# Altium PCB ECE453.PcbDoc
Units mm, origin at the board's own origin, x right, y up, seen from the top; angles counter-clockwise.
Board outline 100 x 100 mm, 2 copper layers (Top Layer, Bottom Layer); 36 components, 16 nets, 110 pads, 40 vias.
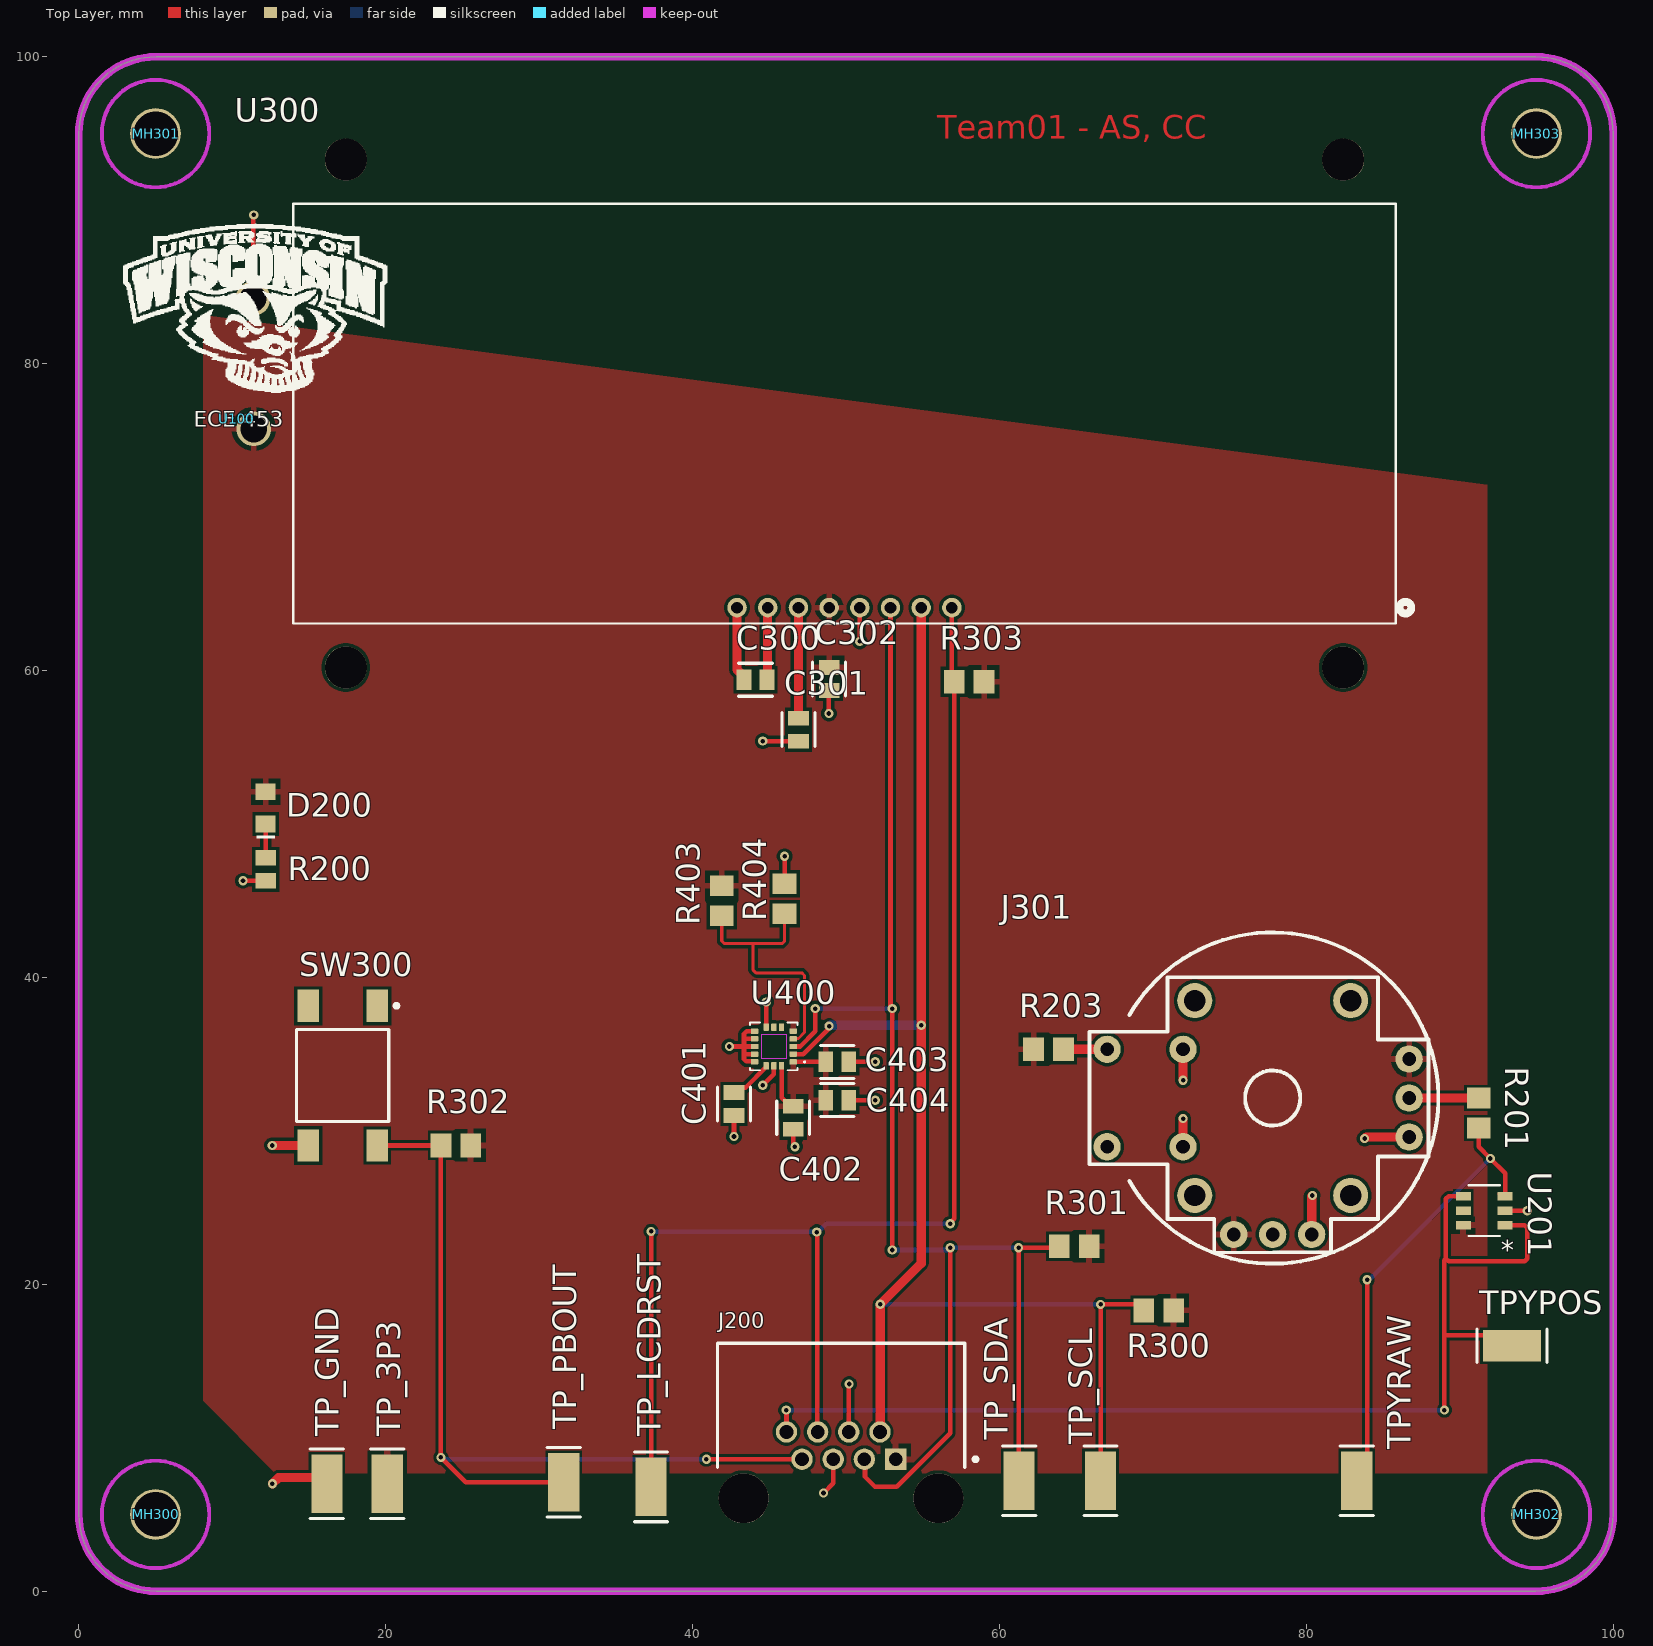
[diagram p0: Top Layer view]
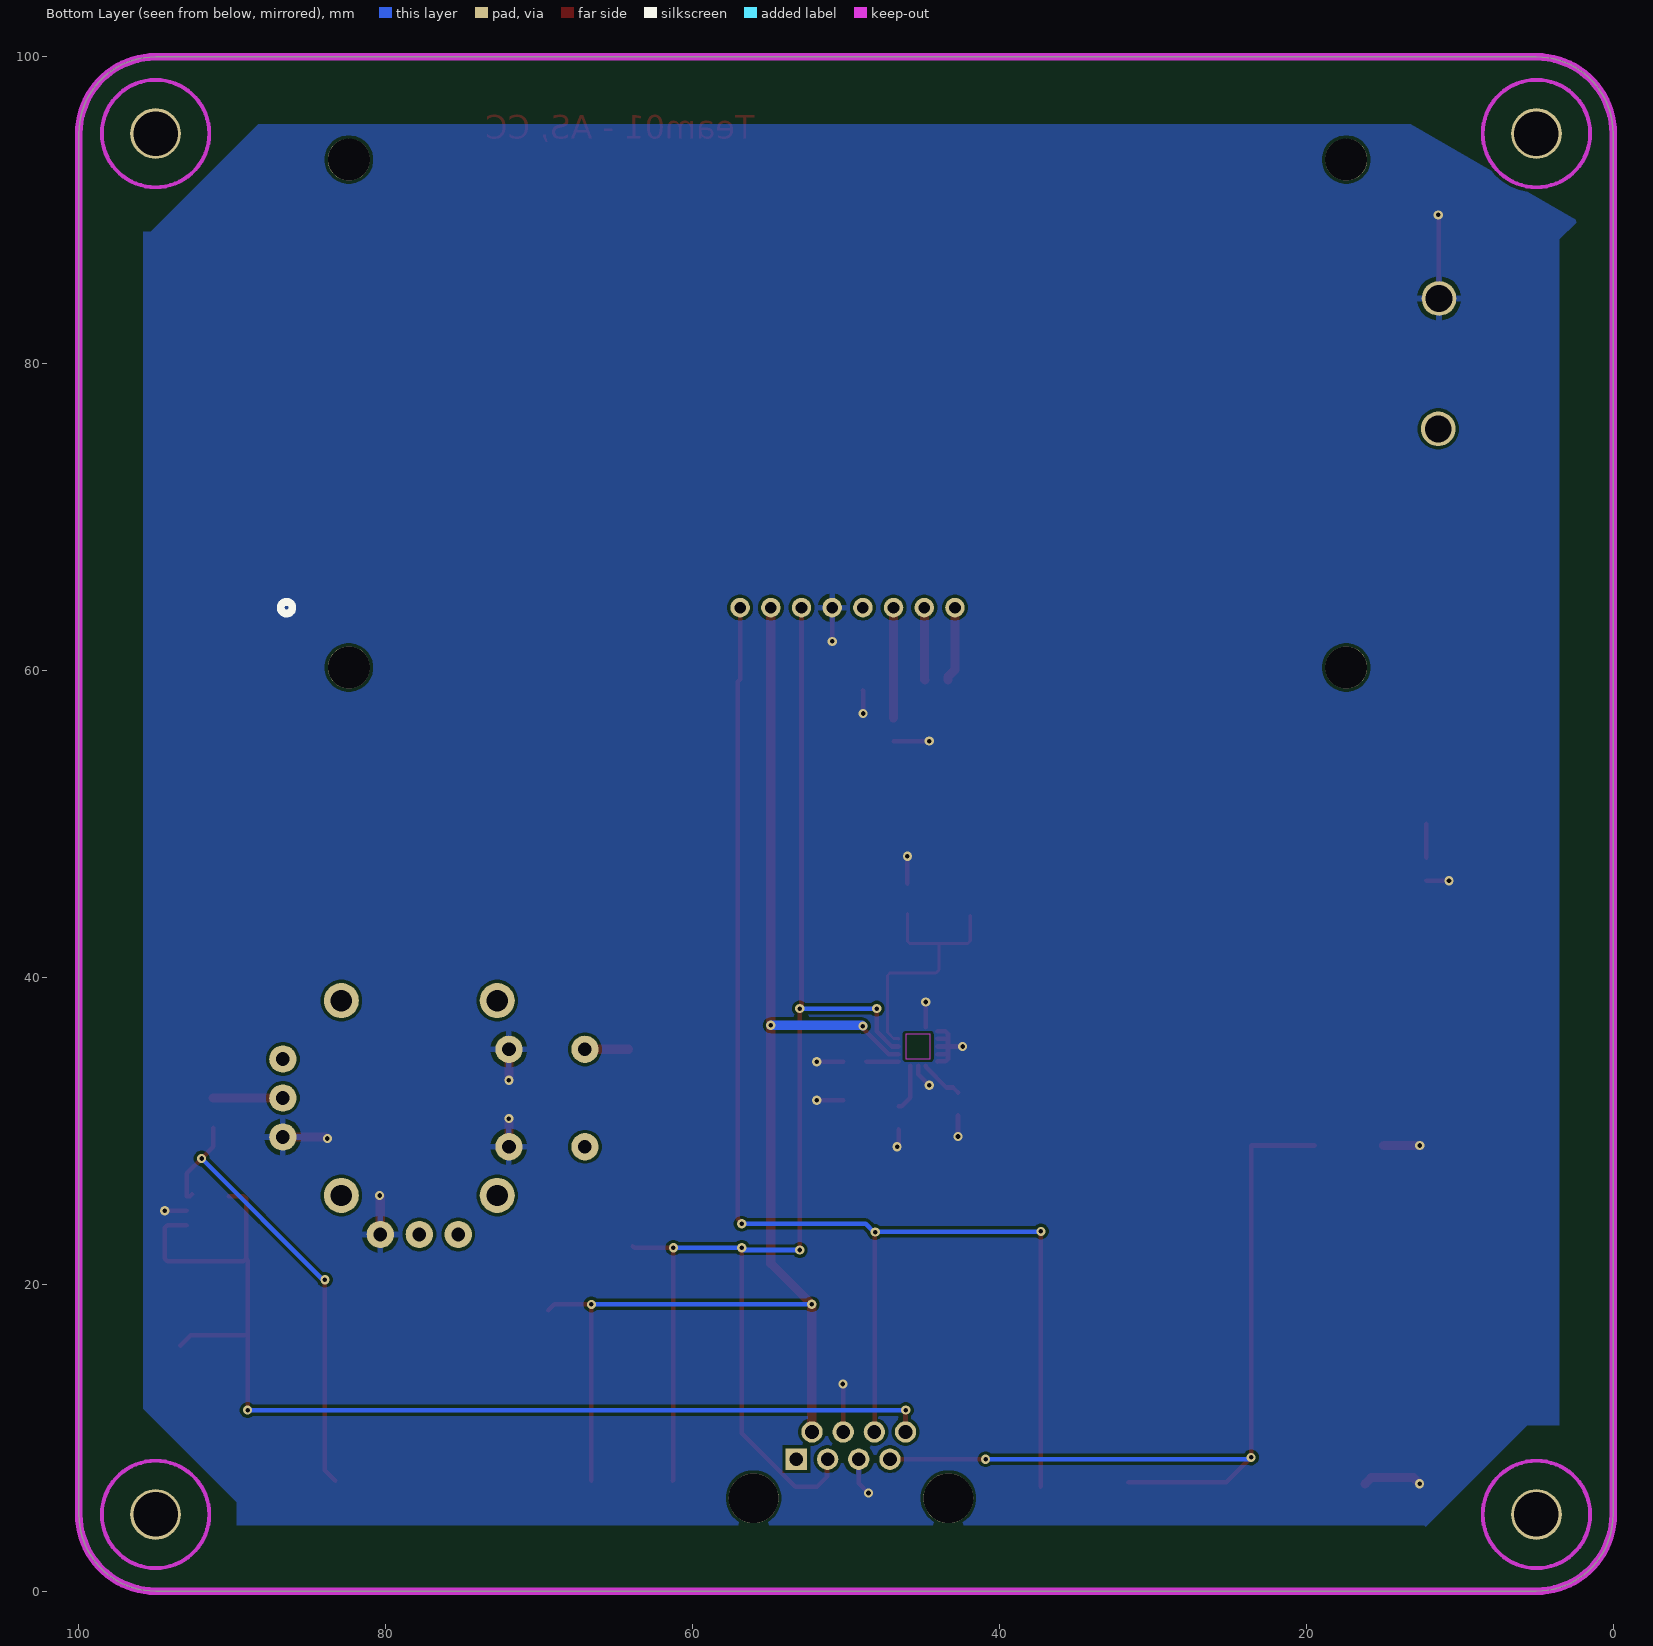
[diagram p1: Bottom Layer view, seen from below]

## Layer stack, top to bottom
Top Solder: solder mask 0.0102, Solder Resist, Dk 3.5
Top Layer: signal copper 0.0356
Dielectric1: dielectric 0.32, FR-4, Dk 4.8
Bottom Layer: signal copper 0.0356
Bottom Solder: solder mask 0.0102, Solder Resist, Dk 3.5

## Board outline
0,5 ccw(c5,5) 5,0 95,0 ccw(c95,5) 100,5 100,95 ccw(c95,95) 95,100 5,100 ccw(c5,95) 0,95

## Design rules (kind name [scope] priority, off if disabled: settings)
Clearance Polygon_Clearance [All vs InPolygon] p1: gap=0.2 ignorepadtopadclearanceinfootprint=FALSE
Clearance [All] p2: gap=0.2 ignorepadtopadclearanceinfootprint=TRUE
ComponentClearance [InComponent('U3')] p1: gap=0 collisioncheckmode=3 verticalgap=0.254 showdistances=FALSE
Height [All] p1: minheight=0 maxheight=75 prefheight=12.7
HoleSize [All] p1: absolutevalues=TRUE maxlimit=6.35 minlimit=0.3 maxpercent=80.000 minpercent=20.000
MinimumAnnularRing [All] p1: minimumring=0.15
MinimumSolderMaskSliver [All] p1: minsoldermaskwidth=0.2
NetAntennae NetAntennae_5.0V [InNet('5.0V')] p1: netantennaetolerance=0
NetAntennae NetAntennae_3.3V [InNet('3.3V')] p2: netantennaetolerance=0
PlaneClearance [All] p1: clearance=0.3
PlaneConnect [All] p1: planeconnectstyle=Relief reliefexpansion=0.3 reliefentries=4 reliefconductorwidth=0.3 reliefairgap=0.3
PolygonConnect ViaConnect [All vs IsVia] p1: connectstyle=Direct reliefconductorwidth=0.381 reliefentries=4 polygonreliefangle="90 Angle" airgapwidth=0.254
PolygonConnect [All] p2: connectstyle=Relief reliefconductorwidth=0.4 reliefentries=4 polygonreliefangle="90 Angle" airgapwidth=0.3
RoutingVias [All] p1: holewidth=0.3 width=0.6 viastyle="Through Hole" minholewidth=0.3 minwidth=0.6 maxholewidth=5 maxwidth=10
SilkToSilkClearance [All] p1: silktosilkclearance=0
SilkToSolderMaskClearance [IsPad] p1: minsilkscreentomaskgap=0 clearancetoexposedcopper=TRUE
SolderMaskExpansion [All] p1: expansion=0.102 istentingtop=FALSE
SupplyNets "Schematic Supply Nets_1" [InNet('GND')] p1: voltage=0.000
SupplyNets "Schematic Supply Nets" [InNet('3.3V')] p2: voltage=0.000
UnConnectedPin [All] p1 off:
Width [All] p1: maxlimit=10 minlimit=0.2 preferedwidth=0.6
21 further rules are at their usual default settings.

## Classes and differential pairs
component class 04-ICs: C401 C402 C403 C404 J301 R201 R203 R403 R404 TPYPOS TPYRAW U201 U400
component class 02_Connectors: D200 J200 R200

## Components (designator, comment, footprint, x,y, rotation, side; value= is the part's Value field where it differs from the comment)
C300 "C0805C104M5RAC7210" FP-C0805C-DN-MFG 44.1,59.4 r0 top value="0.10 μF"
C301 "C0805C104M5RAC7210" FP-C0805C-DN-MFG 46.9,56.15 r270 top value="0.10 μF"
C302 "C0805C104M5RAC7210" FP-C0805C-DN-MFG 48.9,59.45 r270 top value="0.10 μF"
C401 ".47uF" FP-C0805C-DN-MFG 42.7,31.75 r270 top value="10,000 pF"
C402 ".1uF" FP-C0805C-DN-MFG 46.56,30.85 r270 top value="0.10 μF"
C403 "10nF" FP-C0805C-DN-MFG 49.434,34.5 r0 top value="10,000 pF"
C404 "2.2uF" FP-C0805C-DN-MFG 49.434,32 r0 top value="10,000 pF"
D200 "150080GS75000" WL-SMCW_0805_150080xx75000 12.176,51.05 r90 top
J200 "RJHSE-5080" FP-RJHSE-5080-MFG 49.676,8.473 r0 top
J301 "PS4-Joystick" PS4-Joystick 82.89,25.79 r90 top
MH300 "MHOLE_2_95MM" MHOLE_2_95MM 5,5 r0 top locked
MH301 "MHOLE_2_95MM" MHOLE_2_95MM 5,95 r0 top locked
MH302 "MHOLE_2_95MM" MHOLE_2_95MM 95,5 r0 top locked
MH303 "MHOLE_2_95MM" MHOLE_2_95MM 95,95 r0 top locked
R200 "ERA6AEB331V" RESC2013X60X40LL20T25 12.176,47.05 r270 top
R201 "ERJ-6ENF1002V" RESC2013X70X40ML20T20 91.235,31.165 r90 top
R203 "ERJ-6ENF1002V" RESC2013X70X40ML20T20 63.2,35.315 r180 top
R300 "ERJ-6ENF1002V" RESC2013X70X40ML20T20 70.383,18.3 r0 top
R301 "ERJ-6ENF1002V" RESC2013X70X40ML20T20 64.875,22.478 r0 top
R302 "ERJ-6ENF1002V" RESC2013X70X40ML20T20 24.575,29.05 r0 top
R303 "ERJ-6ENF1002V" RESC2013X70X40ML20T20 58.025,59.275 r0 top
R403 "10k" RESC2013X70X40ML20T20 41.9,45 r90 top
R404 "10k" RESC2013X70X40ML20T20 46,45.125 r270 top
SW300 "FSM4JSMA" TECO-FSM4JSMA_V 17.2,33.6 r0 top
TP_3P3 "TP_5019" FP-5019-MFG 20.1,7 r90 top
TP_GND "TP_5019" FP-5019-MFG 16.165,7 r90 top
TP_LCDRST "TP_5019" FP-5019-MFG 37.3,6.8 r90 top
TP_PBOUT "TP_5019" FP-5019-MFG 31.6,7.1 r270 top
TP_SCL "TP_5019" FP-5019-MFG 66.595,7.2 r270 top
TP_SDA "TP_5019" FP-5019-MFG 61.285,7.2 r270 top
TPYPOS "YRAW" FP-5019-MFG 93.4,16 r180 top
TPYRAW "YRAW" FP-5019-MFG 83.29,7.2 r270 top
U100 "Bucky" WalkingBucky 10.3,76.4 r0 top
U201 "TLV9051IDBVR" SOT23_DBV_TEX 91.6,24.8 r180 top
U300 "NHD-C0220BIZ-FSW-FBW-3V3M" NHD-C0220BIZ-FSW-FBW-3V3M_NDI 56.9,64.1 r0 top
U400 "IAM-20380" PQFN50P300X300X80-16N 45.3,35.5 r180 top

## Footprints (in the part's own frame and the unit in brackets; to place one, negate y for a bottom-side part, rotate by r counter-clockwise, add the part's x,y. Pads: shape width x height; smd on the part's side, far side on the other; paste and mask are expansions set on the pad)
FP-5019-MFG [mm]
  rect 3.8x2.03 smd paste+0 mask+0: 1(0,0)
  silkscreen extent -2.27,-1.08 2.27,1.08
FP-C0805C-DN-MFG [mm]
  rect 0.95x1.35 smd paste+0 mask+0: 1(-0.75,0) 2(0.75,0)
  silkscreen extent -1.1,-1.07 1.1,1.07, body extent -1.4,-0.85 1.4,0.85, height 0.25
FP-RJHSE-5080-MFG [mm]
  rect 1.39x1.39 hole 0.89 paste-2539.97 mask+0: 1(3.556,0.127)
  round 1.39 hole 0.89 paste-2539.97 mask+0: 2(2.54,1.905) 3(1.524,0.127) 4(0.508,1.905) 5(-0.508,0.127) 6(-1.524,1.905) 7(-2.54,0.127) 8(-3.556,1.905)
  round 3.25 hole 3.25 unplated paste-2539.97 mask+0: ""(-6.35,-2.413) ""(6.35,-2.413)
  silkscreen extent -8.06,-0.41 8.89,7.68, body extent -8.16,-7.78 8.16,7.78, height 0.25
MHOLE_2_95MM [mm]
  round 3.3 hole 2.9 mask-2539.97: 1(0,0)
  Keep-Out Layer circle w0.254: c0,0 r3.5
NHD-C0220BIZ-FSW-FBW-3V3M_NDI [mil]
  round 50 / inner round 60 / far side round 50 hole 30 paste-99999 mask+0: 1(0,0) 2(-78.74,0) 3(-157.48,0) 4(-236.22,0) 5(-314.96,0) 6(-393.7,0) 7(-472.44,0) 8(-551.18,0)
  round 89 / inner round 60 / far side round 89 hole 69 paste-99999 mask-44.5: 9(-1791.34,458.66) 10(-1793.31,793.31)
  round 108 / inner round 60 / far side round 108 hole 108 unplated paste-99999 mask-54: 11(-1555.12,1149.61) 12(1003.94,1149.61) 13(-1555.12,-153.54) 14(1003.94,-153.54)
  silkscreen extent -1690,-41 1179,1036
PQFN50P300X300X80-16N [mm]
  rrect25% 0.49x0.35 smd: 1(-1.26,1) 2(-1.26,0.5) 3(-1.26,0) 4(-1.26,-0.5) 5(-1.26,-1) 9(1.26,-1) 10(1.26,-0.5) 11(1.26,0) 12(1.26,0.5) 13(1.26,1)
  rrect25% 0.35x0.49 smd: 6(-0.5,-1.26) 7(0,-1.26) 8(0.5,-1.26) 14(0.5,1.26) 15(0,1.26) 16(-0.5,1.26)
  Keep-Out Layer region: 0.8,-0.8 -0.8,-0.8 -0.8,0.8 0.8,0.8
  Keep-Out Layer region: 0.8,-0.8 -0.8,-0.8 -0.8,0.8 0.8,0.8
  silkscreen extent -2.05,-1.55 1.55,1.55
PS4-Joystick [mil]
  round 70 hole 35: H1(150,-150) H2(250,-150) H3(350,-150) S1A(125,430) S1B(375,430) S2A(125,625) S2B(375,625) V1(-100,300) V2(-100,200) V3(-100,100)
  round 90 hole 55: M1(0,400) M2(500,400) M3(500,0) M4(0,0)
  silkscreen extent -175,-225 675,670
RESC2013X60X40LL20T25 [mm] "Chip Resistor, 2-Leads, Body 2.00x1.25mm, IPC High Density"
  rect 1x1.35 smd: 1(-0.75,0) 2(0.75,0)
  body extent -1.1,-0.72 1.1,0.72, height 0.6
RESC2013X70X40ML20T20 [mm] "Chip Resistor, 2-Leads, Body 2.00x1.25mm, IPC Low Density"
  rect 1.35x1.55 smd: 1(-0.975,0) 2(0.975,0)
  body extent -1.1,-0.72 1.1,0.72, height 0.7
SOT23_DBV_TEX [mil]
  rect 38.5x22 smd paste+0 mask+0: 1(-53.75,37.4) 2(-53.75,0) 3(-53.75,-37.4) 4(53.75,-37.4) 5(53.75,0) 6(53.75,37.4)
  silkscreen extent -40,-65 40,65, body extent -59,-60 59,60, height 57
TECO-FSM4JSMA_V [mm] "SMD, 4-Leads, Body 6x6mm, Pitch 4.5mm"
  rect 1.4x2.1 smd: 1(2.25,4.55) 2(2.25,-4.55) 3(-2.25,4.55) 4(-2.25,-4.55)
  silkscreen extent -3,-3 3.63,4.67, body extent -3,-5 3,5, height 5.08
WalkingBucky [mm]
  silkscreen extent -7.42,1.75 9.8,12.73
WL-SMCW_0805_150080xx75000 [mm] "SMD Mono-color Chip LED, body 2.0x1.25mm"
  rect 1.1x1.3 smd: 1(-1.05,0) 2(1.05,0)
  silkscreen extent -2,-0.6 -1.8,0.6, body extent -1,-0.63 1,0.62, height 0.7

## Part data
C300 C301: library part CMP-03020-012155-1, "1uF", Capacitance="0.10 μF", Manufacturer=KEMET, Package=C0805C-DN, Temperature="-55°C to +125°C", Temperature Characteristic=X7R, Temperature Coefficient=30ppm/°C, Temperature Range High=+125°C, Temperature Range Low=-55°C, Tolerance=0.2, Voltage Rating="50 V", Automotive=No, Category=Cap, ComponentLink2Description=Datasheet, ComponentLink2URL=https://content.kemet.com/datasheets/KEM_C1003_C0G_SMD.pdf, Device Class L1="Passive Components", Device Class L2=Capacitors, Device Class L3="Ceramic Capacitors", Height=0.88mm, Ipc Land Pattern Name=CAPC200125X78, Lead Free=Yes, Manufacturer Part Number=C0805C104M5RAC7210, Material=Ceramic, Octopart=https://octopart.com/c0805c104m5rac7210-kemet-3909515, RoHS=TRUE
C302: library part CMP-03020-012155-1, "C0805 0.10 μF X7R 30ppm/°C 20.00% 50 V", Capacitance="0.10 μF", Manufacturer=KEMET, Package=C0805C-DN, Temperature="-55°C to +125°C", Temperature Characteristic=X7R, Temperature Coefficient=30ppm/°C, Temperature Range High=+125°C, Temperature Range Low=-55°C, Tolerance=0.2, Voltage Rating="50 V", Automotive=No, Category=Cap, ComponentLink2Description=Datasheet, ComponentLink2URL=https://content.kemet.com/datasheets/KEM_C1003_C0G_SMD.pdf, Device Class L1="Passive Components", Device Class L2=Capacitors, Device Class L3="Ceramic Capacitors", Height=0.88mm, Ipc Land Pattern Name=CAPC200125X78, Lead Free=Yes, Manufacturer Part Number=C0805C104M5RAC7210, Material=Ceramic, Octopart=https://octopart.com/c0805c104m5rac7210-kemet-3909515, RoHS=TRUE
C401 C403 C404: library part CMP-2007-01081-3, "CAP CER SMD 0805 .01UF 100V X7R", Capacitance="10,000 pF", Manufacturer=KEMET, Manufacturer Part Number=C0805C103K1RAC7210, Package=C0805C-DN, Temperature="-55°C to +125°C", Temperature Characteristic=X7R, Temperature Coefficient=30ppm/°C, Temperature Range High=+125°C, Temperature Range Low=-55°C, Tolerance=0.1, Voltage Rating="100 V", Automotive=No, Category=Cap, ComponentLink2Description=Datasheet, ComponentLink2URL=https://content.kemet.com/datasheets/KEM_C1003_C0G_SMD.pdf, Device Class L1="Passive Components", Device Class L2=Capacitors, Device Class L3="Ceramic Capacitors", Digikey Description="CAP CER SMD 0805 .01UF 100V X7R", Height=0.88mm, Ipc Land Pattern Name=CAPC200125X78, Lead Free=Yes, Material=Ceramic, Mouser Description="Multilayer Ceramic Capacitors MLCC - SMD/SMT 100volts 10000pF X7R 10%", Octopart=https://octopart.com/c0805c103k1rac7210-kemet-3919887, RoHS=TRUE
C402: library part CMP-2007-00279-2, "CAP CER 0.1UF 50V X7R 0805", Capacitance="0.10 μF", Manufacturer=KEMET, Manufacturer Part Number=C0805C104K5RACTU, Package=C0805C-DN, Temperature="-55°C to +125°C", Temperature Characteristic=X7R, Temperature Coefficient=30ppm/°C, Temperature Range High=+125°C, Temperature Range Low=-55°C, Tolerance=0.1, Voltage Rating="50 V", Automotive=No, Category=Cap, ComponentLink2Description=Datasheet, ComponentLink2URL=https://content.kemet.com/datasheets/KEM_C1003_C0G_SMD.pdf, Device Class L1="Passive Components", Device Class L2=Capacitors, Device Class L3="Ceramic Capacitors", Digikey Description="CAP CER 0.1UF 50V X7R 0805", Height=0.88mm, Ipc Land Pattern Name=CAPC200125X78, Lead Free=Yes, Material=Ceramic, Mouser Description="Cap Ceramic 0.1uF 50V X7R 10% SMD 2.0 x 1.2 mm 125 C Paper T/R", Octopart=https://octopart.com/c0805c104k5ractu-kemet-143926, RoHS=TRUE
D200: library part CMP-1426-00007-3, "WURTH ELEKTRONIK - 150080GS75000 - LED, Green, SMD, 0805, 30 mA, 3.2 V, 520 nm", Case Code (Imperial)=0805, Case Code (Metric)=2012, Color=Green, Forward Current=100mA, Forward Voltage=3.2V, Max Junction Temperature (Tj)=95°C, Max Operating Temperature=85°C, Max Reverse Voltage (DC)=5V, Min Operating Temperature=-40°C, Power Dissipation=105mW, Test Current=20mA, Case/Package=0805, Dominant Wavelength=525nm, Height=700µm, Length=2mm, Lens Style="Clear, Rectangular", Luminous Intensity=450mcd, Mount="Surface Mount", Packaging="Tape and Reel", Peak Wavelength=515nm, REACH SVHC=Unknown, Reverse Voltage=5V, RoHS=Compliant, Viewing Angle=140°, Wavelength=525nm, Width=1.25mm
J200: library part CMP-02366-000003-1, "CONN MOD JACK 8P8C R/A UNSHLD", Contact Resistance=20mR, Current Rating=1.5A, Manufacturer=Amphenol, Max Voltage Rating (AC)=125V, Package=CONN_MOD_JACK, Supplier Part Number=RJHSE-5080-ND, Temperature="-55°C to +85°C", Temperature Range High=+85°C, Temperature Range Low=-55°C, Automotive=No, Category=Conn, ComponentLink1Description=https://datasheet.ciiva.com/7629/1682821-7629402.pdf?src-supplier=Element14, ComponentLink1URL=https://datasheet.ciiva.com/7629/1682821-7629402.pdf?src-supplier=Element14, ComponentLink2Description=Datasheet, ComponentLink2URL=https://cdn.amphenol-icc.com/media/wysiwyg/files/documentation/datasheet/inputoutput/io-modjack-rjhse.pdf, ComponentLink3Description=https://datasheet.ciiva.com/1432/1693748-1432448.pdf?src-supplier=Element14, ComponentLink3URL=https://datasheet.ciiva.com/1432/1693748-1432448.pdf?src-supplier=Element14, Conn Gender=Female, Conn Orientation="Right Angle", Connector Type=RJ45, Contact Material=Gold,Nickel, Contact Plating=Gold, Depth=14.99mm, Device Class L1=Connectors, Device Class L2="Modular / Ethernet Connectors", Device Class L3=unset, Digikey Description="CONN MOD JACK 8P8C R/A UNSHLD", Footprint Url=https://cdn.amphenol-icc.com/media/wysiwyg/files/drawing/rjhse5080.pdf?__cf_chl_jschl_tk__=e349db0bbbb6188a39347cd5e541b92fa02c9719-1587748343-0-AW7tChdeHzRPLX9gSWj7WrKaXQoY9BsmT9Ek0h-T62M9y3Rs9iypFcOtkzb-6sGYQEjFE-jcoNciDETCOZrh1rYyOesac5SvYLoLwHIsHvF4AKBlx-MXmfZUVk9OTTJLqyQq2qMm0PFRLJpNcK0nrKResqOniRSYixG2sPTmOPraH-ULJFBDL602CHqcI9KKBgTq90Jh1OL2Td4moJ99rFsJRJ1Tk_uoxGe8ublcP_ARu-uLpWcQrBcwOcHDTAwL29DAwVaqcH7ta8Ks7WMlHmVl_pILeEDwT0bE9vu5Pa5S3PtNRF1leuFkgi_FMbUxTDulc5xzbXSfng8srUIV1lWXny5nx1fZJEUa_w97yKjffzBMxiWLWVN-V7-uqAaPbyv_m-wRyw5O25OZNyJOeGU, Gender=Female, Height=0.535inch, Is Female=yes, Lead Free=Yes, Length=15.75mm, Manufacturer Part Number=RJHSE-5080, Max Current Rating=1.5A, Mounting Technology="Through Hole,Panel", Mouser Description="Modular Connectors / Ethernet Connectors R/A RJ45 NONSHIELDED 8 CONT NO LEDS", Number Of Contacts=8, Number of Ports=1, Number of Positions=8, Number of Positions Loaded=8, Octopart=https://octopart.com/rjhse-5080-amphenol-45060, Orientation="Right Angle", Packaging=Rail/Tube, Pitch=1.02mm, Pricing="1=1.03, 10=0.867, 25=0.832, 50=0.8142, 100=0.7788, 250=0.708, 500=0.6372, 1000=0.56641, 2500=0.51331 (USD)", Radiation Hardening=No, Reach SVHC Compliant=Unknown, RoHS=TRUE, RoHS Compliant=Yes, Stock=72112, Supplier=Digikey, Termination=Solder, Voltage Rating=125V, Voltage Rating (DC)=125V
MH300 MH301 MH302 MH303: "Mounting Holde", Manufacturer Part Number="UW MTHOLE"
R200: library part CMP-2001-00628-1, Manufacturer=Panasonic, Part Number=ERA6AEB331V
R201 R203 R300 R301 R302 R303: library part CMP-2001-04376-1, Manufacturer=Panasonic, Part Number=ERJ-6ENF1002V
R403 R404: library part CMP-2001-04376-1, Manufacturer=Panasonic, Part Number=ERJ-6ENF1002V
SW300: library part CMP-2000-05602-2, "Swicth, SPST, 24 V, -35 to 85 degC, 4-Pin SMD, RoHS, Tape and Reel", Case\/Package=SMD/SMT, Contact Current Rating=50mA, Contact Resistance=100mOhm, Manufacturer="TE Connectivity", Max Operating Temperature=85degC, Max Voltage Rating (DC)=12V, Min Operating Temperature=-35degC, Operating Force=1.57N, Package Description="4-Pin Surface Mount Device, Body 6 x 6 mm, Pitch 4.5 mm", Package Quantity=750, Voltage Rating=24V, Actuator Length=0.055inch, Actuator Material=Polyamide, Contact Material=CopperAlloy, Contact Plating=Silver, Current Rating=50mA, Datasheet URL=http://www.te.com/commerce/DocumentDelivery/DDEController?Action=showdoc&DocId=Customer+Drawing%7F2-1437565-7%7FV%7Fpdf%7FEnglish%7FENG_CD_2-1437565-7_V.pdf%7F4-1437565-2, Datasheet Version="Rev. V, 02/2015", Electrical Life=100000Cycles, Illumination Type=Illuminated, Length=6mm, Manufacturer URL=http://www.te.com/, Mechanical Life=100000Cycles, Mount=SurfaceMount, Mounting Technology=SurfaceMount, Orientation=Straight, Package Reference=FSM4JSMA, Packaging=LoosePiece, REACH SVHC=Unknown, RoHSCompliant=true, Switch Travel=0.25mm, Termination=GullWing, Throw Configuration=SPST, Voltage Rating (DC)=24V, Width=6mm
TP_3P3 TP_GND TP_LCDRST TP_PBOUT TP_SCL TP_SDA: "Test Point, Mini, SMT, Phos Bronze/Silver, 1000pc Tape & Reel", Manufacturer="Keystone Electronics", Manufacturer Part Number=5019, Package Quantity=1, Supplier Part Number 1=36-5019CT-ND, Body Material=Bronze, Category=Terminals, ComponentLink1Description=https://datasheet.ciiva.com/14848/m60-2p61-14848437.pdf?src-supplier=Digikey, ComponentLink1URL=https://datasheet.ciiva.com/14848/m60-2p61-14848437.pdf?src-supplier=Digikey, ComponentLink2Description=https://datasheet.ciiva.com/14848/m60-2p61-14848438.pdf?src-supplier=Digikey, ComponentLink2URL=https://datasheet.ciiva.com/14848/m60-2p61-14848438.pdf?src-supplier=Digikey, ComponentLink3Description=https://datasheet.ciiva.com/14848/m60-2p61-14848439.pdf?src-supplier=Digikey, ComponentLink3URL=https://datasheet.ciiva.com/14848/m60-2p61-14848439.pdf?src-supplier=Digikey, ComponentLink4Description=https://datasheet.ciiva.com/16885/70182998-16885945.pdf?src-supplier=Allied+Electronics, ComponentLink4URL=https://datasheet.ciiva.com/16885/70182998-16885945.pdf?src-supplier=Allied+Electronics, ComponentLink5Description=https://datasheet.ciiva.com/16318/m60-2p61-16318395.pdf?src-supplier=Future+Electronics, ComponentLink5URL=https://datasheet.ciiva.com/16318/m60-2p61-16318395.pdf?src-supplier=Future+Electronics, Contact Material=Bronze, Contact Plating=Silver, Height=0.09inch, Lead Free="Lead Free", Material=Bronze, Mounting Technology="Surface Mount,PCB", Number Of Contacts=1NUMBER, Packaging="Tape and Reel", Pins=1, Plating=Silver, Pricing="1=0.37, 25=0.2496, 100=0.2117, 250=0.1902, 500=0.1756, 1000=0.16229, 2000=0.15019, 3000=0.14362, 5000=0.13585, 7000=0.13102, 10000=0.12613, 25000=0.1211 (USD)", Reach SVHC Compliant=No, RoHS=Yes, RoHS Compliant=Yes, Series=5019, Stock=282853, Supplier 1=Digikey, Termination=SMD/SMT
TPYPOS TPYRAW: library part TP_5019, "Test Point, Mini, SMT, Phos Bronze/Silver, 1000pc Tape & Reel", Manufacturer="Keystone Electronics", Manufacturer Part Number=5019, Package Quantity=1, Supplier Part Number 1=36-5019CT-ND, Body Material=Bronze, Category=Terminals, ComponentLink1Description=https://datasheet.ciiva.com/14848/m60-2p61-14848437.pdf?src-supplier=Digikey, ComponentLink1URL=https://datasheet.ciiva.com/14848/m60-2p61-14848437.pdf?src-supplier=Digikey, ComponentLink2Description=https://datasheet.ciiva.com/14848/m60-2p61-14848438.pdf?src-supplier=Digikey, ComponentLink2URL=https://datasheet.ciiva.com/14848/m60-2p61-14848438.pdf?src-supplier=Digikey, ComponentLink3Description=https://datasheet.ciiva.com/14848/m60-2p61-14848439.pdf?src-supplier=Digikey, ComponentLink3URL=https://datasheet.ciiva.com/14848/m60-2p61-14848439.pdf?src-supplier=Digikey, ComponentLink4Description=https://datasheet.ciiva.com/16885/70182998-16885945.pdf?src-supplier=Allied+Electronics, ComponentLink4URL=https://datasheet.ciiva.com/16885/70182998-16885945.pdf?src-supplier=Allied+Electronics, ComponentLink5Description=https://datasheet.ciiva.com/16318/m60-2p61-16318395.pdf?src-supplier=Future+Electronics, ComponentLink5URL=https://datasheet.ciiva.com/16318/m60-2p61-16318395.pdf?src-supplier=Future+Electronics, Contact Material=Bronze, Contact Plating=Silver, Height=0.09inch, Lead Free="Lead Free", Material=Bronze, Mounting Technology="Surface Mount,PCB", Number Of Contacts=1NUMBER, Packaging="Tape and Reel", Pins=1, Plating=Silver, Pricing="1=0.37, 25=0.2496, 100=0.2117, 250=0.1902, 500=0.1756, 1000=0.16229, 2000=0.15019, 3000=0.14362, 5000=0.13585, 7000=0.13102, 10000=0.12613, 25000=0.1211 (USD)", Reach SVHC Compliant=No, RoHS=Yes, RoHS Compliant=Yes, Series=5019, Stock=282853, Supplier 1=Digikey, Termination=SMD/SMT
U100: "Bucky Badger Image", Manufacturer Part Number="UW Bucky"
U201: "Single 5-MHz, 15-V/µs high slew-rate, RRIO op amp 5-SOT-23 -40 to 125", Manufacturer="Texas Instruments", Supplier Part Number=595-TLV9051IDBVR, Category="Amplifiers - Op Amps, Buffer, Instrumentation", Manufacturer Part Number=TLV9051IDBVR, Mfr_Name="Texas Instruments", Pricing="1=0.47, 10=0.294, 50=0.294, 100=0.237, 1000=0.216, 10000=0.191 (USD)", RefDes=RefDes, RoHS=Yes, Stock=3599, Supplier=Mouser, Type=Type
U300: "LCD COG CHAR 2X20 WH TRANSFL", Background Color=White, Manufacturer="Newhaven Display", Max Operating Temperature=70°C, Mfr_Name="Newhaven Display International", Min Operating Temperature=-20°C, Operating Supply Voltage=3.3V, Supplier Part Number=NHD-C0220BIZ-FSW-FBW-3V3M-ND, Backlight Type=LED, ComponentLink1Description=https://datasheet.ciiva.com/2102/nhd-c0220biz-fsw-fbw-3v3m-2102241.pdf?src-supplier=Digikey, ComponentLink1URL=https://datasheet.ciiva.com/2102/nhd-c0220biz-fsw-fbw-3v3m-2102241.pdf?src-supplier=Digikey, ComponentLink2Description=https://datasheet.ciiva.com/5326/nhd-c0220biz-fsw-fbw-3v3m-31762-5326184.pdf?src-supplier=Mouser, ComponentLink2URL=https://datasheet.ciiva.com/5326/nhd-c0220biz-fsw-fbw-3v3m-31762-5326184.pdf?src-supplier=Mouser, ComponentLink3Description=https://datasheet.ciiva.com/30148/nhd-c0220biz-fsw-fbw-3v3m-30148736.pdf?src-supplier=Onlinecomponents.com, ComponentLink3URL=https://datasheet.ciiva.com/30148/nhd-c0220biz-fsw-fbw-3v3m-30148736.pdf?src-supplier=Onlinecomponents.com, ComponentLink4Description=https://datasheet.ciiva.com/19478/2189011-19478701.pdf?src-supplier=Jameco, ComponentLink4URL=https://datasheet.ciiva.com/19478/2189011-19478701.pdf?src-supplier=Jameco, Contrast Ratio=6:1, Fluid Type="FSTN POSITIVE", Interface=I2C, Manufacturer Part Number=NHD-C0220BIZ-FSW-FBW-3V3M, Mounting Technology="Through Hole", Number of Characters=40, Packaging=Bulk, Pins=8, Pricing="1=11.41, 5=10.726, 10=10.041, 50=9.4704, 100=9.2394 (USD)", RefDes=RefDes, RoHS=Yes, RoHS Compliant=Yes, Series=-, Stock=13689, Supplier=Digikey, Type=Type
U400: "Gyroscope X _Pitch_, Y _Roll_, Z _Yaw_ Â±250, 500, 1000, 2000 27kHz IÂ²C, SPI 16-LGA _3x3_", Package="PQFN-16 TDK-InvenSense", Availability=Unavailable, MF="TDK InvenSense", MP=IAM-20380, Price=None, SnapEDA_Link=https://www.snapeda.com/parts/IAM-20380/TDK%20InvenSense/view-part/2757130/?ref=snap

## Via types
v1: diameter 0.6, hole 0.3, Top Layer to Bottom Layer, 40 vias

## Nets (pads, with @x,y where several pads share a name; then routed paths per layer and width w, separated by ;. In a path a pad name is that pad's centre, name@x,y a point inside that pad or via, vN(x,y) a via of type N, cw(c..) or ccw(c..) an arc to the next point about the centre after c; other vN are vias at no path point)
3.3V: C302.1 C402.1 C403.1 C404.1 D200.2 J200.1 J301.H3 J301.V1 R203.2 R300.2 R301.2 R302.2 R303.2 R403.2 TP_3P3.1 U201.6 U300.5 U300.9 U400.1 U400.5 U400.16 | length 5.2
  Top Layer w0.3: U400.16 45.8,32.16 46.36,31.6 C402.1 ; U400.1 C403.1
C1+: C300.2 U300.7 | length 4.7
  Top Layer w0.6: C300.2 44.875,59.425 44.875,64.075 U300.7
C1-: C300.1 U300.8 | length 4.9
  Top Layer w0.6: U300.8 42.9,60.05 43.35,59.6 C300.1
GND: C301.2 C302.2 C401.2 C402.2 C403.2 C404.2 J200.4 J200.5 J301.H1 J301.S1A J301.S1B J301.V3 R200.2 R404.1 SW300.4 TP_GND.1 U201.2 U300.4 U300.10 U400.8 U400.9 U400.10 U400.11 U400.12 U400.13 U400.15 | length 52.8
  Top Layer w0.3: v1(10.7,46.3) R200.2 ; U300.10 11.375,84.275 11.375,89.675 v1(11.4,89.7) ; v1(42.4,35.5) 43.35,35.5 ; v1(42.7,29.634) C401.2 ; U400.13 44.015,34.525 43.501,34.525 43.35,34.676 43.35,35 ; U400.12 43.35,35 ; U400.11 43.35,35.5 ; U400.10 43.438,36 43.35,35.912 ; U400.9 43.526,36.5 43.35,36.324 43.35,35.912 ; v1(44.578,32.975) 45.3,33.697 U400.15 ; v1(44.578,55.4) C301.2 ; U400.8 v1(44.8,38.4) ; R404.1 v1(46,47.9) ; C402.2 46.56,29.156 46.67,29.046 v1(46.67,28.965) ; v1(48.537,6.4) 49.168,7.031 J200.5 ; v1(48.884,57.2) 48.884,58.684 C302.2 ; J200.4 50.184,13.484 v1(50.2,13.5) ; C404.2 v1(51.9,32) ; C403.2 v1(51.9,34.5) ; v1(50.9,61.9) U300.4 ; U201.2 v1(94.4,24.8) ; 43.35,35 43.35,35.5 ; 43.35,35.5 43.35,35.912
  Top Layer w0.6: v1(12.6,29.05) SW300.4 ; v1(12.615,7) 13.015,7.4 15.765,7.4 TP_GND.1 ; J301.S1A v1(71.968,30.8) ; v1(71.968,33.3) J301.S1B ; J301.V3 80.35,25.74 v1(80.4,25.79) ; v1(83.8,29.5) 83.9,29.6 J301.H1
LCDRST: J200.6 R303.1 TP_LCDRST.1 U300.1 | length 89.8
  Top Layer w0.3: TP_LCDRST.1 v1(37.3,23.45) ; v1(48.1,23.4) 48.126,23.374 48.126,10.404 J200.6 ; v1(56.8,23.95) 56.8,24.031 57.05,24.281 R303.1 56.9,59.425 U300.1
  Bottom Layer w0.3: v1(37.3,23.45) 37.325,23.425 48.075,23.425 v1(48.1,23.4) 48.175,23.4 48.725,23.95 v1(56.8,23.95)
NetC401_1: C401.1 U400.14 | length 2.9
  Top Layer w0.3: C401.1 43.025,32.825 43.455,32.825 44.8,34.17 U400.14
NetJ301_H2: J301.H2 R201.2 | length 4.5
  Top Layer w0.6: J301.H2 R201.2
NetJ301_S2B: J301.S2B R203.1 | length 2.8
  Top Layer w0.6: R203.1 J301.S2B
NetR403_1: R403.1 R404.2 U400.4 | length 17.5
  Top Layer w0.2: R403.1 41.9,42.376 42.076,42.2 43.95,42.2 ; R404.2 46,42.376 45.824,42.2 43.95,42.2 ; U400.4 46.585,36.025 46.904,36.025 47.3,36.421 47.3,40.124 47.124,40.3 44.126,40.3 43.95,40.476 43.95,42.2
PB_OUT: J200.7 R302.1 SW300.2 TP_PBOUT.1 | length 56.7
  Top Layer w0.3: SW300.2 R302.1 v1(23.6,8.718) 25.218,7.1 TP_PBOUT.1 ; v1(40.9,8.6) J200.7
  Bottom Layer w0.3: v1(23.6,8.718) 23.681,8.718 23.799,8.6 v1(40.9,8.6)
PWR_ON: D200.1 R200.1 | length 2.2
  Top Layer w0.3: R200.1 D200.1
SCL: J200.2 R300.1 TP_SCL.1 U300.2 U400.2 | length 92.9
  Top Layer w0.3: U400.2 47.222,35 48.9,36.678 v1(48.9,36.83) ; J200.2 J200.2@52.226,10.389 ; v1@52.226,18.69 v1(52.237,18.7) ; TP_SCL.1 v1(66.595,18.69) 69.018,18.69 R300.1
  Top Layer w0.6: J200.2@52.226,10.389 v1@52.226,18.69 ; v1(52.237,18.7) 54.9,21.363 v1(54.9,36.88) U300.2
  Bottom Layer w0.3: v1(52.237,18.7) 52.242,18.695 66.589,18.695 v1(66.595,18.69)
  Bottom Layer w0.6: v1(48.9,36.83) 48.95,36.88 v1(54.9,36.88)
SDA: J200.3 R301.1 TP_SDA.1 U300.3 U400.3 | length 96.7
  Top Layer w0.3: U400.3 47.015,35.5 48,36.485 v1(48,37.972) ; J200.3 51.237,8.563 51.237,7.455 51.892,6.8 53.317,6.8 56.8,10.283 v1(56.8,22.379) ; v1@52.9,38.163 U300.3 ; v1(53.01,22.235) v1(53.01,37.972) ; TP_SDA.1 61.25,7.235 v1(61.25,22.379) 63.801,22.379 R301.1
  Bottom Layer w0.3: v1(48,37.972) v1(53.01,37.972) ; v1(53.01,22.235) 56.657,22.235 v1(56.8,22.379) v1(61.25,22.379)
VOUT: C301.1 U300.6 | length 7.2
  Top Layer w0.6: C301.1 U300.6
YPOS_R: J200.8 TPYPOS.1 U201.1 U201.4 | length 73
  Top Layer w0.3: v1(46.1,11.8) 46.12,11.78 J200.8 ; v1(89,11.8) 89,16.688 ; U201.4 89.276,25.75 89.1,25.574 89.1,21.676 ; U201.1 94.224,23.85 94.4,23.674 94.4,21.676 94.224,21.5 89.276,21.5 89.1,21.676 ; TPYPOS.1 92.712,16.688 89,16.688 ; 89,16.688 89,21.576 89.1,21.676
  Bottom Layer w0.3: v1(46.1,11.8) v1(89,11.8)
YRAW: R201.1 TPYRAW.1 U201.3 | length 30.2
  Top Layer w0.3: TPYRAW.1 83.965,7.874 v1(83.965,20.3) ; R201.1 91.235,28.965 v1(92,28.2) 92.965,27.235 U201.3 92.756,25.75 U201.3@92.626,25.879
  Bottom Layer w0.3: v1(83.965,20.3) 84.1,20.3 v1(92,28.2)
pads on no net: J200. J301.M1 J301.M2 J301.M3 J301.M4 J301.S2A J301.V2 MH300.1 MH301.1 MH302.1 MH303.1 SW300.1 SW300.3 U201.5 U300.11 U300.12 U300.13 U300.14 U400.6 U400.7

## Polygon pours and split planes (outlines as drawn)
GND on Bottom Layer "GND_L02_P000" (solid, pour order 0): 2.3,89.3 3.5,88.1 3.5,10.8 5.6,10.8 12.2,4.2 12.3,4.3 89.7,4.3 89.7,5.8 95.8,11.9 95.8,88.6 95.3,88.6 88.3,95.6 13.2,95.6
3.3V on Top Layer "3.3V_L01_P002" (solid, pour order 2): 8.1,83.19 8.1,12.4 13.1,7.4 13.4,7.7 91.8,7.7 91.8,72.118

## Keep-outs
Keep-Out Layer:
  lines w0.254: 5,-0.127 cw(c5,5) -0.127,5 -0.127,95 ; -0.127,95 cw(c5,95) 5,100.127 95,100.127 ; -0.127,95 -0.127,95 ; 0.127,95 cw(c5,95) 5,99.873 95,99.873 ; 0.127,95 0.127,95 ; 0.127,95 0.127,5 ccw(c5,5) 5,0.127 ; 5,-0.127 95,-0.127 ccw(c95,5) 100.127,5 100.127,95 ccw(c95,95) 95,100.127 ; 5,-0.127 5,-0.127 ; 5,0.127 95,0.127 ccw(c95,5) 99.873,5 99.873,95 ccw(c95,95) 95,99.873 ; 5,0.127 5,0.127 ; 95,99.873 95,99.873 ; 95,100.127 95,100.127

## Other copper
Top Layer:
  text "Team01 - AS, CC" at 55.954,94.662 h1.52

## Silkscreen, mask and mechanical layers (free items; w line width, h text height)
Mechanical 2:
  the board outline again, w0.254

## Text inside footprints (layer, text, board x,y; h text height)
U100: Top Overlay "ECE 453" at 7.506,75.892 h1.02
U201: Top Overlay "*" at 93.537,23.418 h1.27 r180; Mechanical 13 "*" at 92.413,24.622 h1.27 r180